# Altium PCB PCB_Gateway.PcbDoc (part 1 of 2)
Units mm, origin at the board's own origin, x right, y up, seen from the top; angles counter-clockwise.
Board outline 107.98 x 107.96 mm, 2 copper layers (Top Layer, Bottom Layer); 168 components, 117 nets, 706 pads, 81 vias.
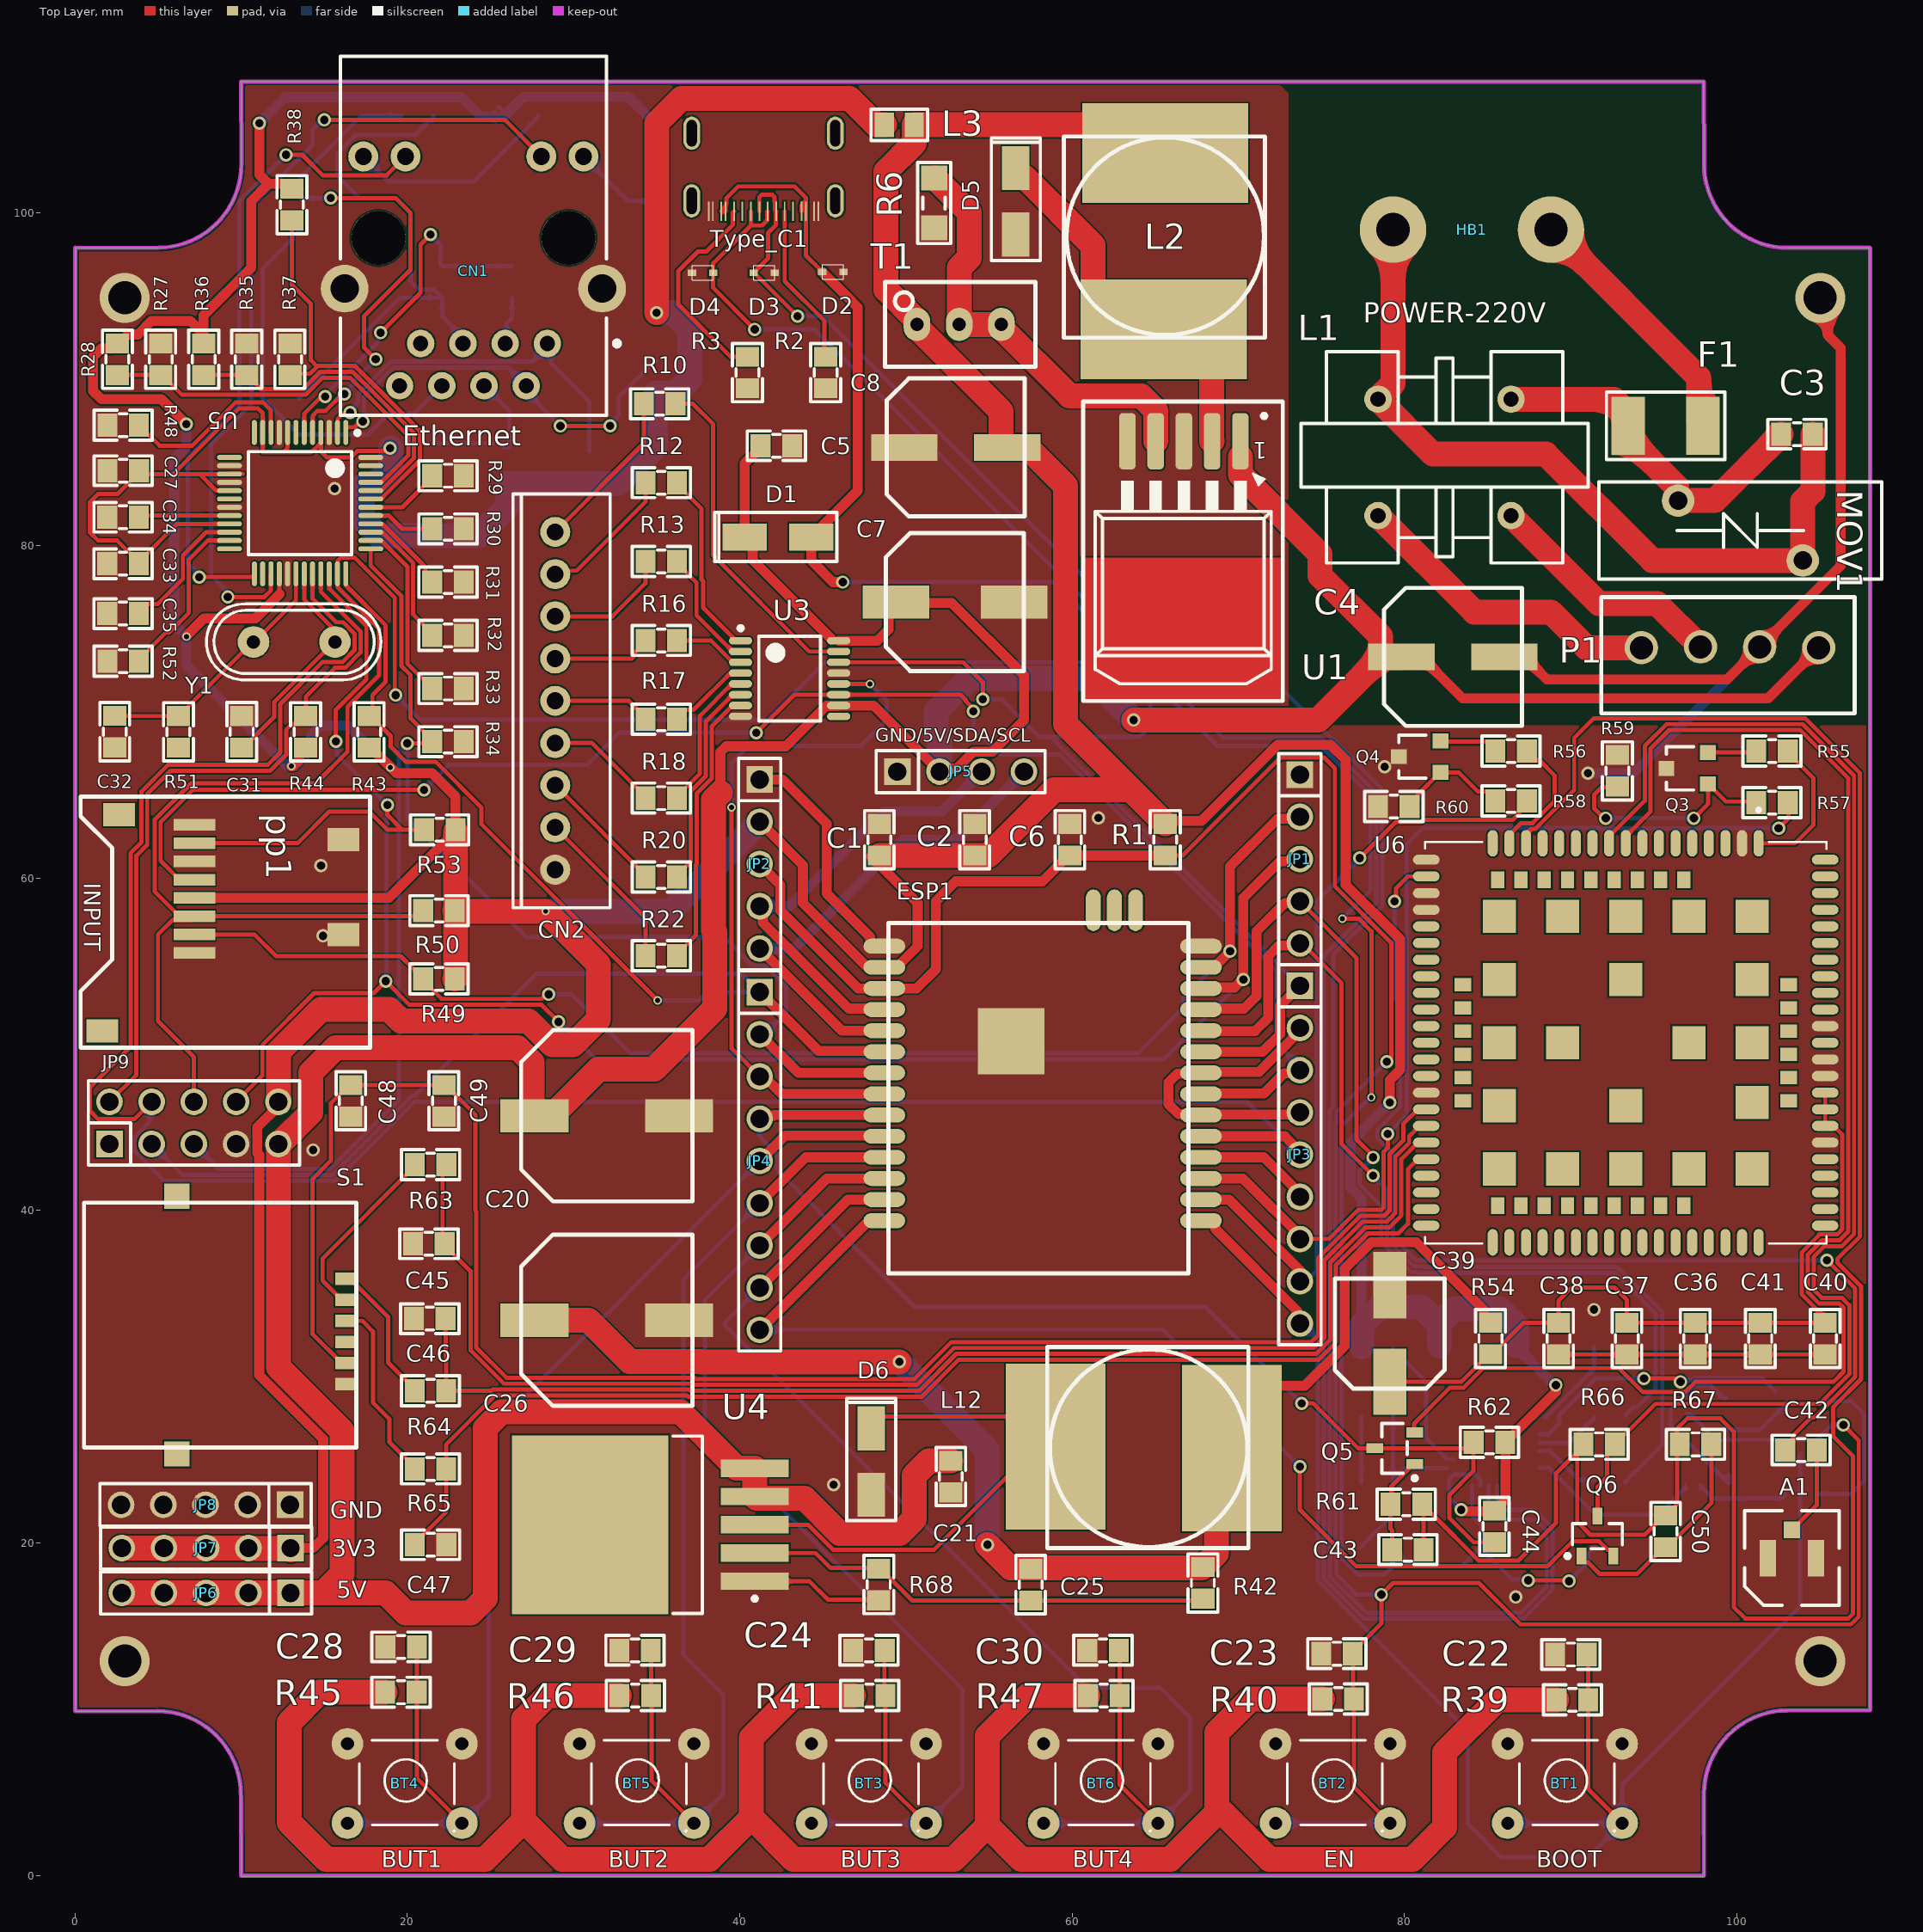
[diagram p0: Top Layer view]
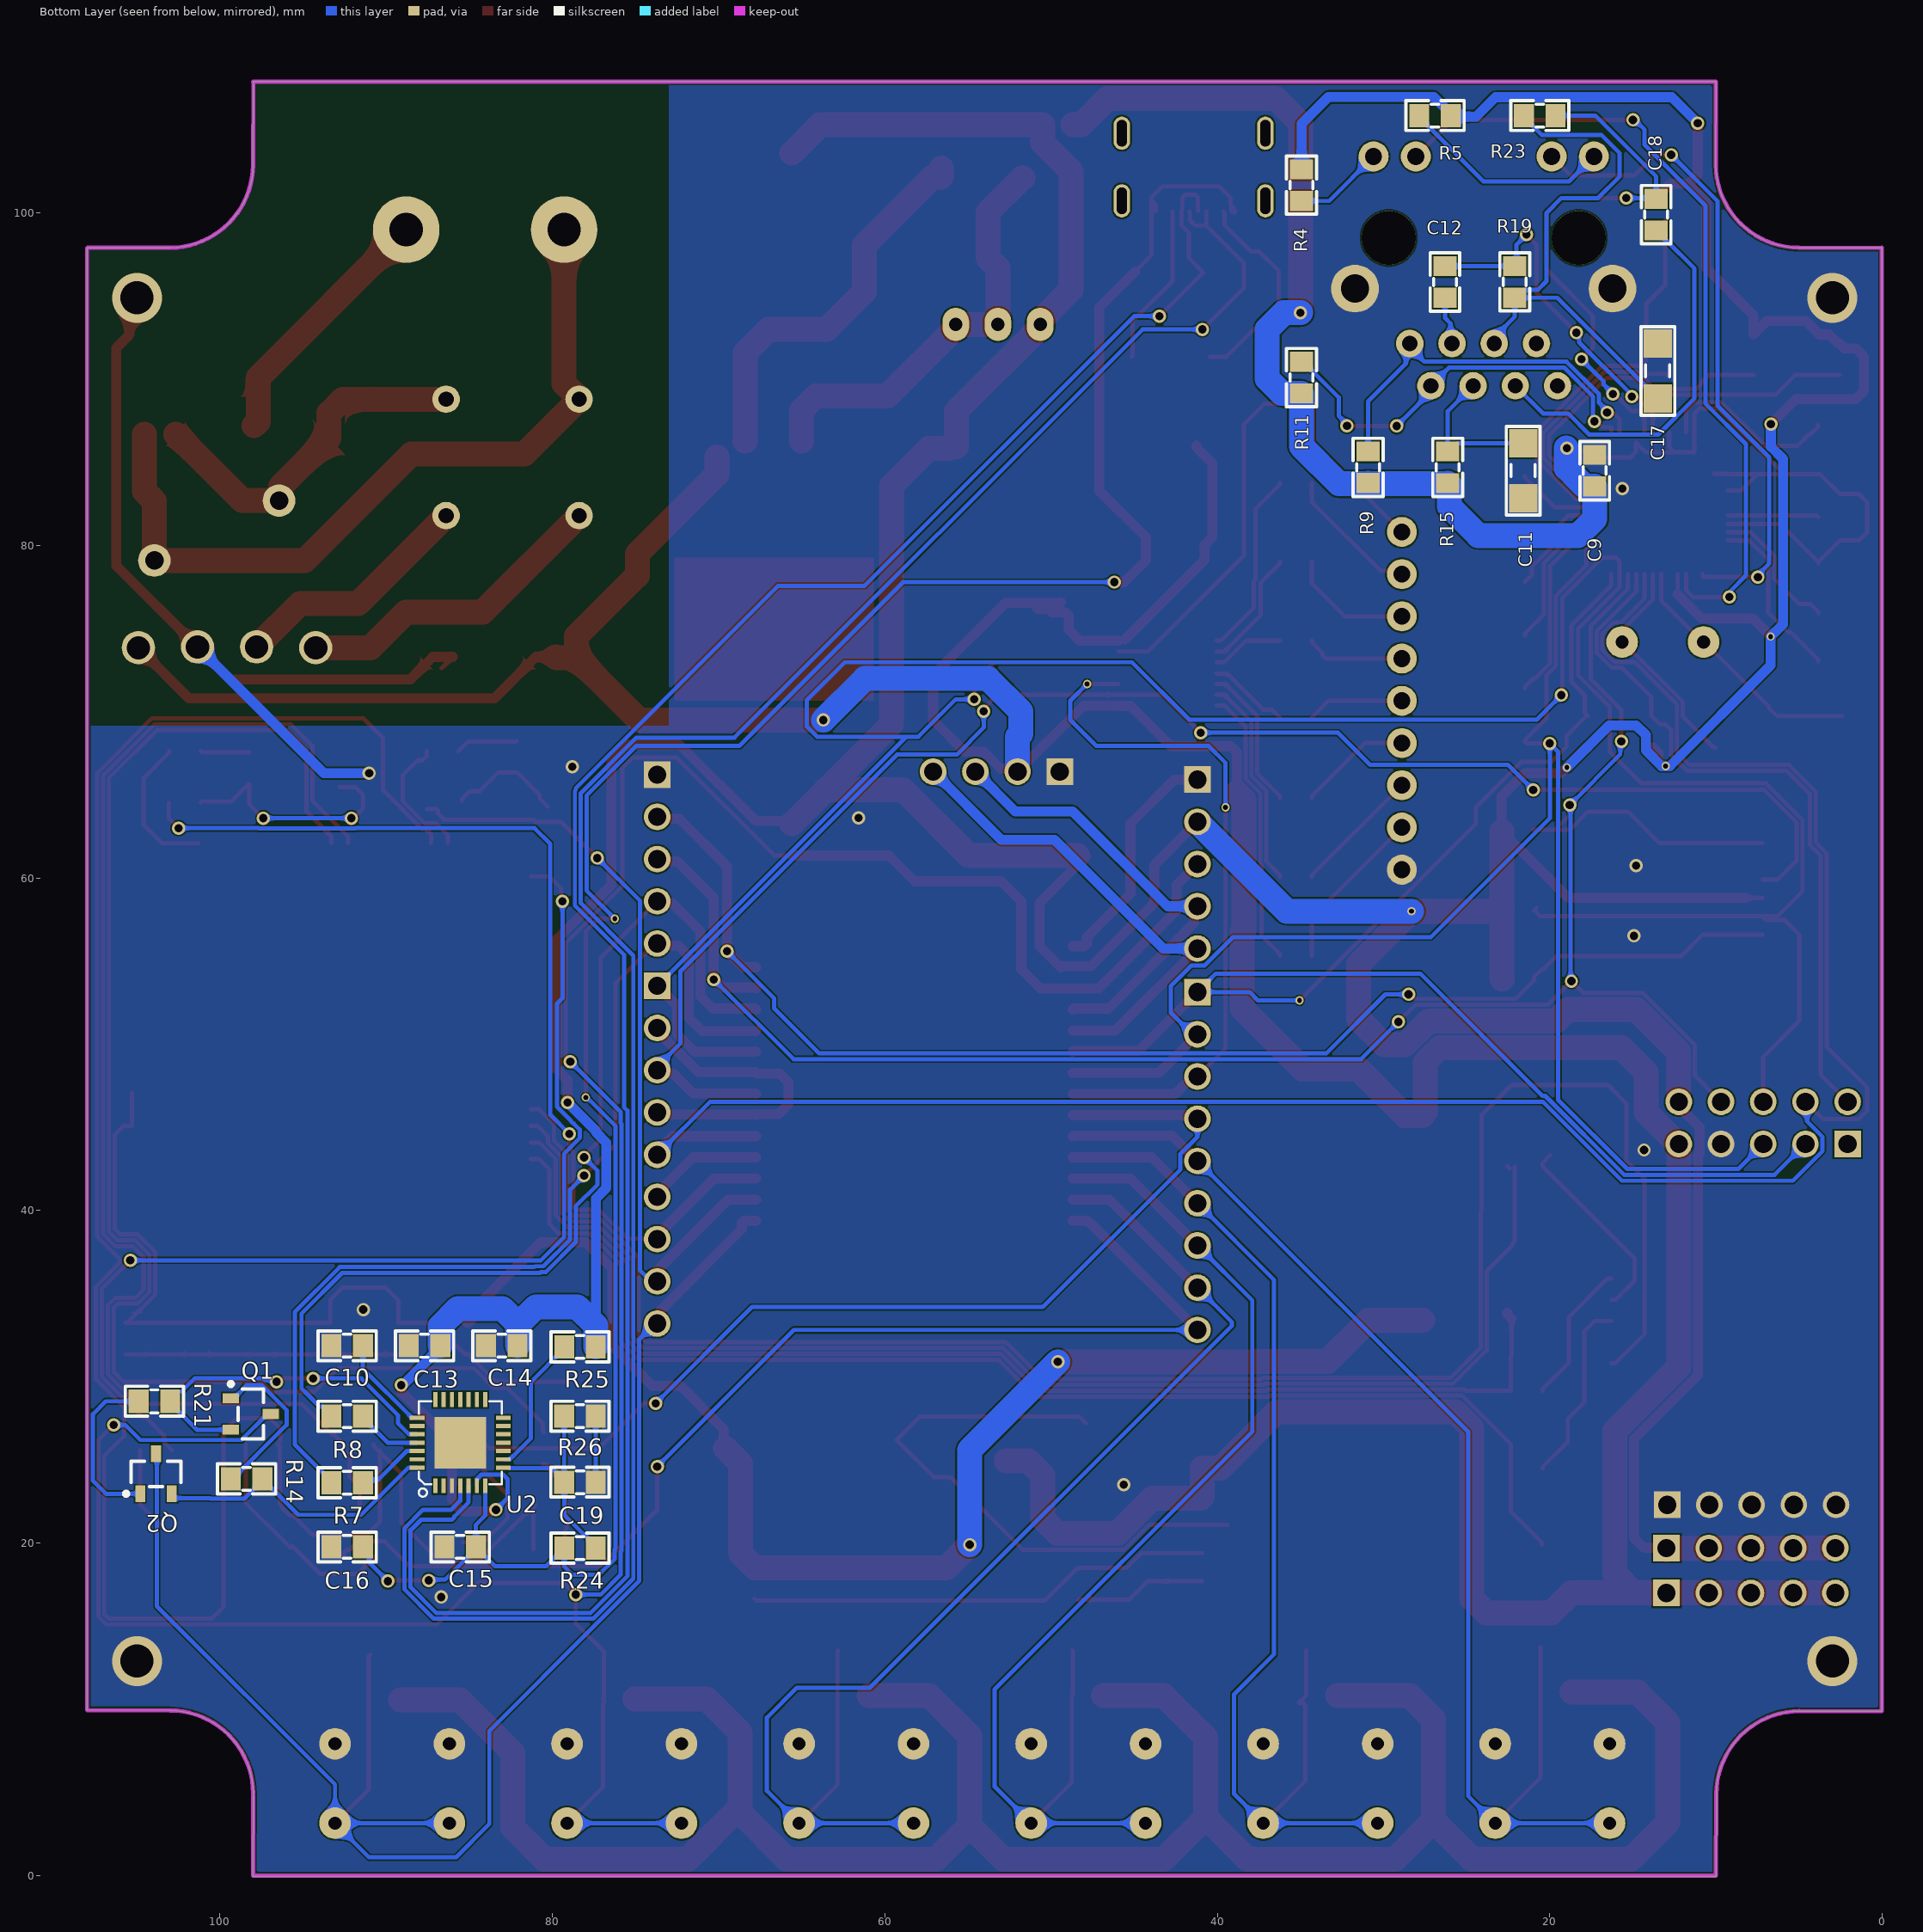
[diagram p1: Bottom Layer view, seen from below]
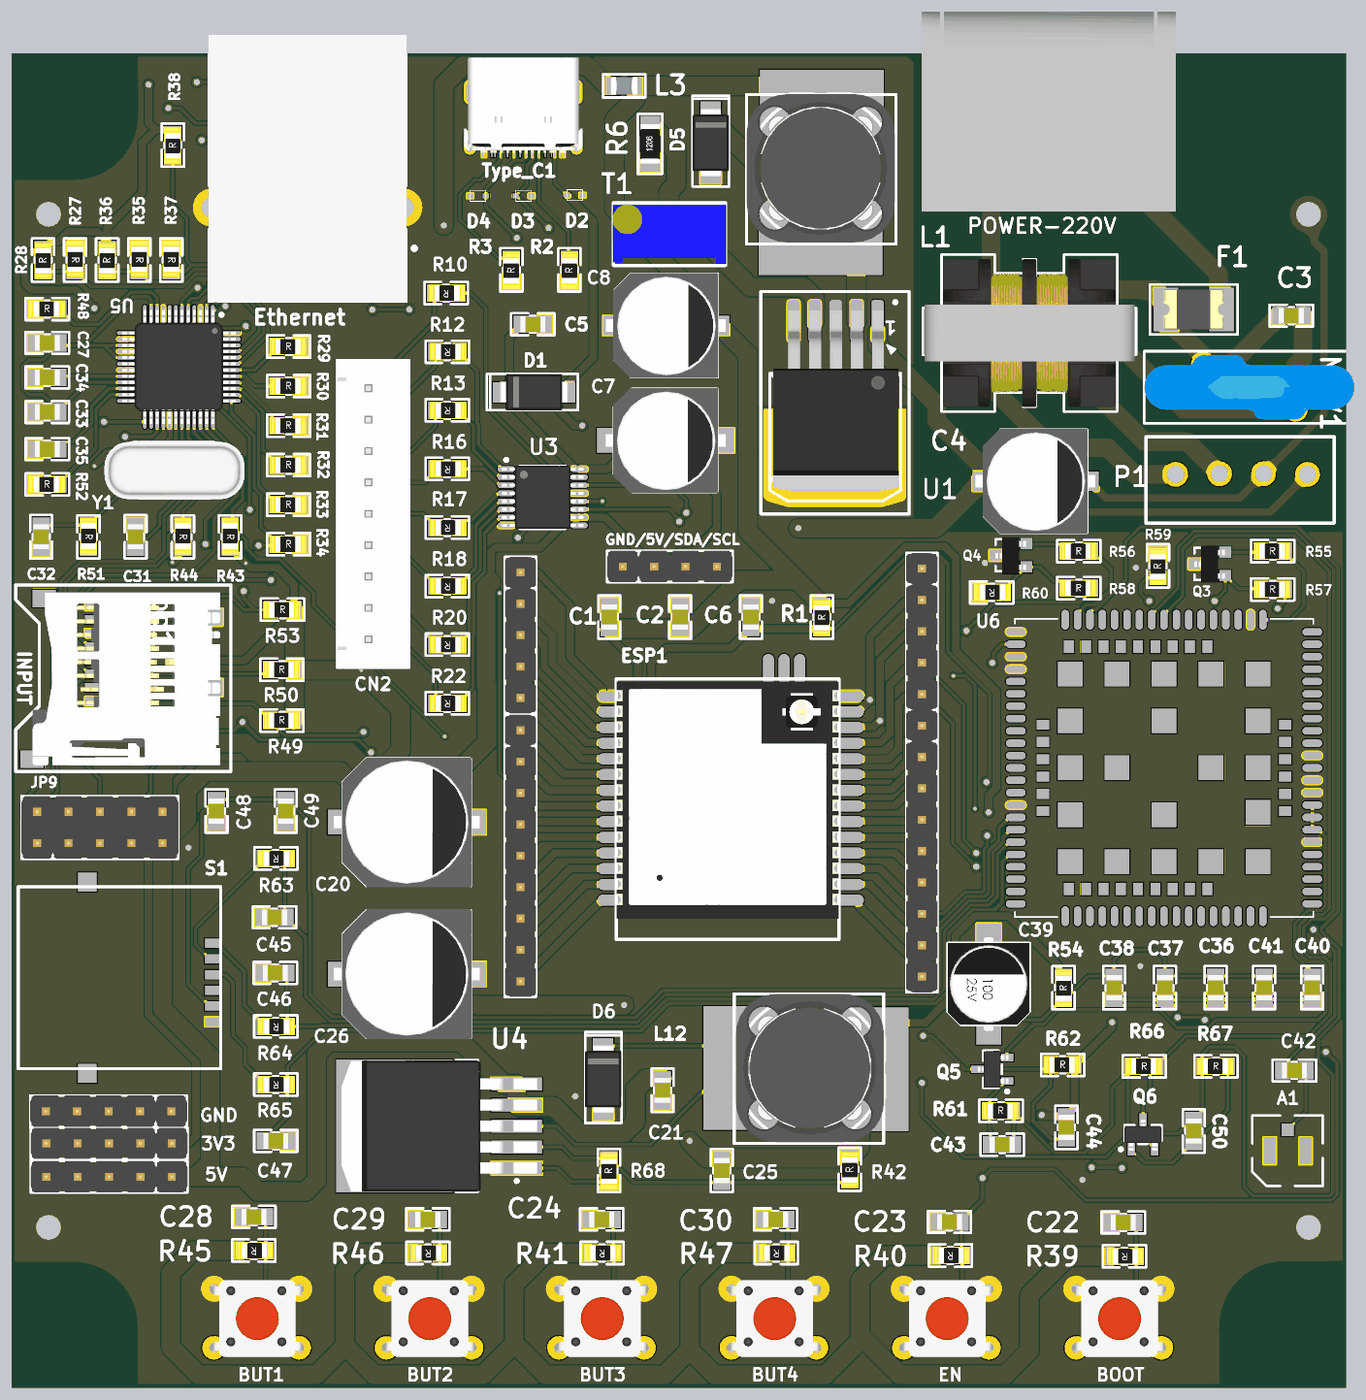
[diagram p3: 3D render of the assembled board from above, using the file's embedded part models]
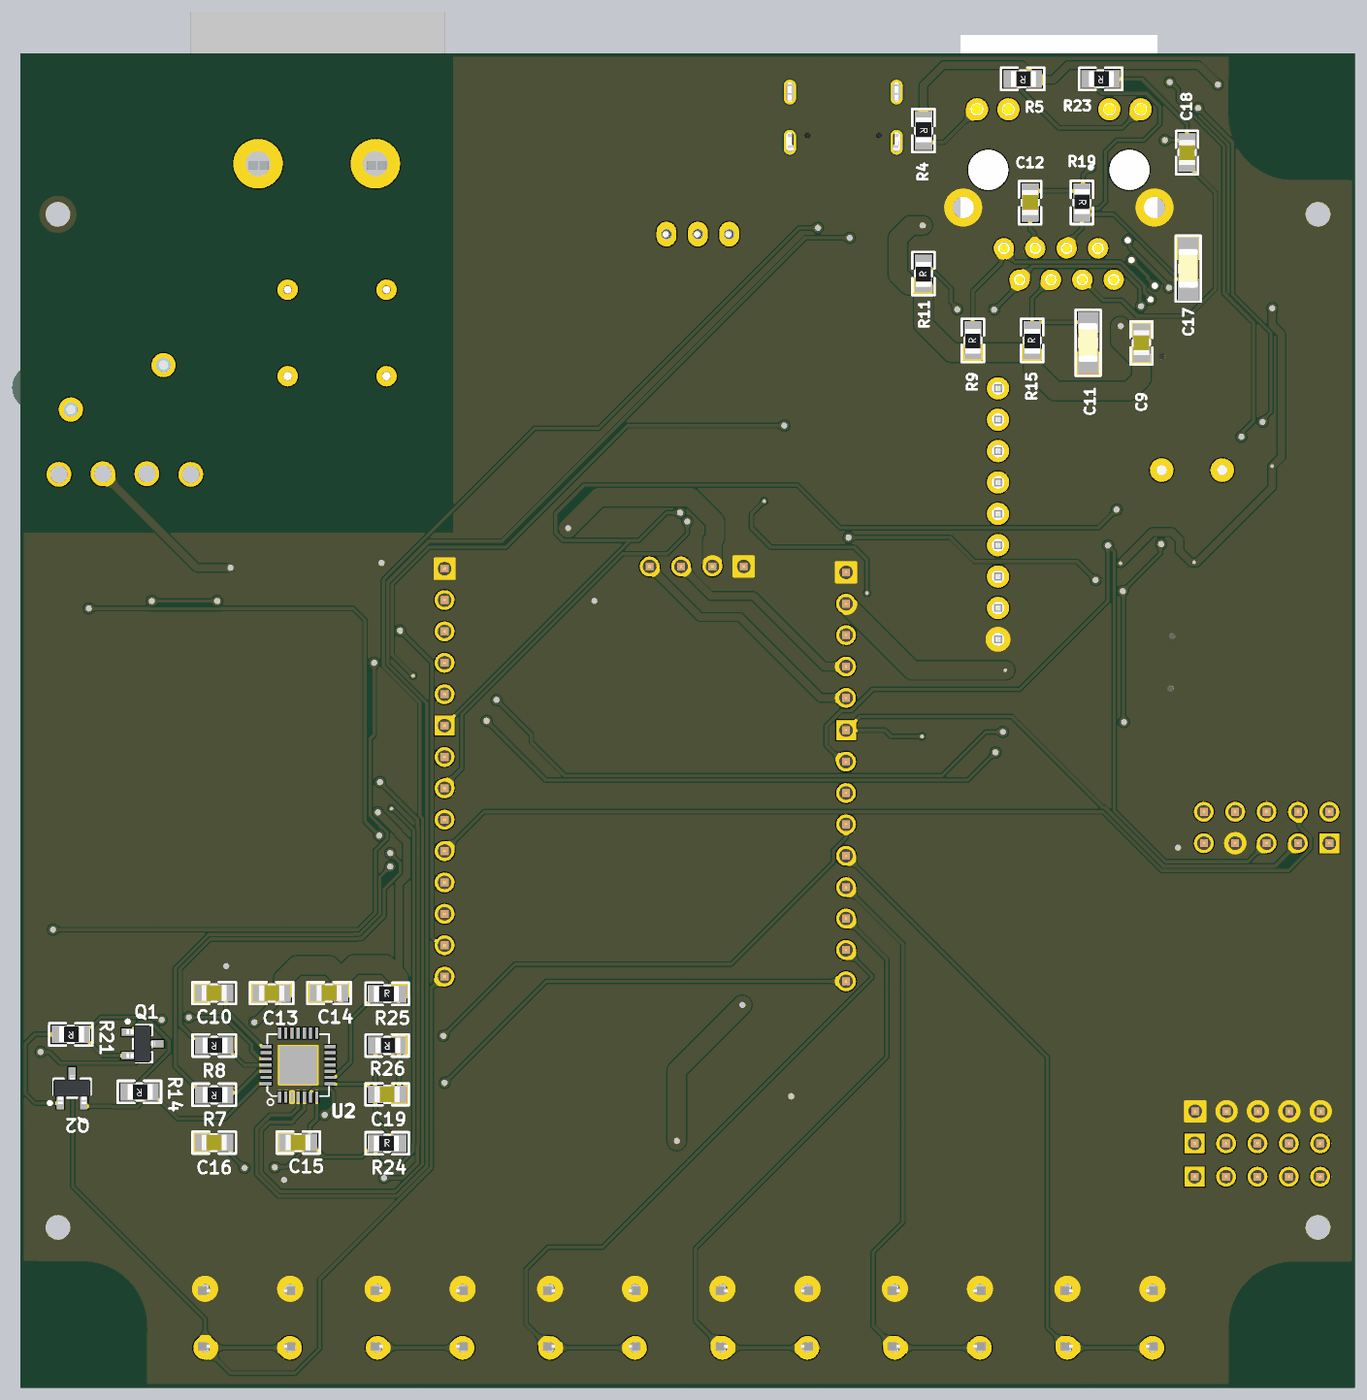
[diagram p4: 3D render of the assembled board from below, using the file's embedded part models]

## Layer stack, top to bottom
Top Solder: solder mask 0.0102, Solder Resist, Dk 3.5
Top Layer: signal copper 0.0356
Dielectric 1: dielectric 0.32, FR-4, Dk 4.8
Bottom Layer: signal copper 0.0356
Bottom Solder: solder mask 0.0102, Solder Resist, Dk 3.5

## Board outline
4.995,9.893 cw(c4.962,4.869) 9.986,4.906 10.007,-0.041 10.007,-0.056 98.016,-0.056 98.007,4.94 cw(c103.031,4.907) 102.994,9.93 108,9.951 108,97.9 107.968,97.916 103.005,97.907 cw(c103.038,102.931) 98.014,102.894 97.993,107.841 98,107.9 10,107.9 10.008,107.868 10.017,102.905 cw(c4.994,102.938) 5.031,97.914 0.084,97.893 0.025,97.925 0.025,9.884

## Design rules (kind name [scope] priority, off if disabled: settings)
Clearance [All] p1: gap=0.1 ignorepadtopadclearanceinfootprint=FALSE
HoleSize [All] p1: absolutevalues=TRUE maxlimit=3.5 minlimit=0.025 maxpercent=80.000 minpercent=20.000
PlaneConnect [All] p1: planeconnectstyle=Direct reliefexpansion=0.508 reliefentries=4 reliefconductorwidth=0.254 reliefairgap=0.254
PolygonConnect [All] p1: connectstyle=Direct reliefconductorwidth=0.254 reliefentries=4 polygonreliefangle="90 Angle" airgapwidth=0.254
RoutingVias [All] p1: holewidth=0.711 width=1.27 viastyle="Through Hole" minholewidth=0.711 minwidth=1.27 maxholewidth=0.711 maxwidth=1.27
SilkToSolderMaskClearance [IsPad] p1: minsilkscreentomaskgap=0.01 clearancetoexposedcopper=TRUE
SolderMaskExpansion [All] p1: expansion=0.102 istentingtop=FALSE useseparateexpansions=TRUE expansionbottom=0.102 istentingbottom=FALSE
Width [All] p1: maxlimit=1.5 minlimit=0.254 preferedwidth=0.6
27 further rules are at their usual default settings.

## Components (designator, comment, footprint, x,y, rotation, side; value= is the part's Value field where it differs from the comment)
A1 "Anten_IPEX" Anten_IPEX 103.3,17.4 r90 top
BT1 "BOOT" "Nut Nhan 4 Chan Cam 6x6" 86.53,8.131 r0 top
BT2 "EN" "Nut Nhan 4 Chan Cam 6x6" 72.57,8.131 r0 top
BT3 "BUT3" "Nut Nhan 4 Chan Cam 6x6" 44.65,8.131 r0 top
BT4 "BUT1" "Nut Nhan 4 Chan Cam 6x6" 16.73,8.131 r0 top
BT5 "BUT2" "Nut Nhan 4 Chan Cam 6x6" 30.69,8.131 r0 top
BT6 "BUT4" "Nut Nhan 4 Chan Cam 6x6" 58.61,8.131 r0 top
C1 "106 (10V/20%)" "tu 0805" 48.4,62.3 r90 top
C2 "104 (10V/10%)" "tu 0805" 54.13,62.3 r90 top
C3 "104 0.1uF/275V" "tu 0805" 103.6,86.7 r0 top
C4 "220uF" "tu nhom 8 (e)" 82.9,73.3 r0 top
C5 "106" "tu 0805" 42.2,86 r0 top
C6 "105 (10V/10%)" "tu 0805" 59.86,62.3 r90 top
C7 "100uF" "tu nhom 8 (f)" 52.95,76.6 r0 top
C8 "220uF" "tu nhom 8 (e)" 53,85.9 r0 top
C9 "104 (10V/10%)" "tu 0805" 17.3,84.5 r90 bottom
C10 "104 (10V/10%)" "tu 0805" 92.349,31.864 r0 bottom
C11 "22nF" "tu 1206" 21.6,84.5 r90 bottom
C12 "6.8nF" "tu 0805" 26.303,95.846 r90 bottom
C13 "104 (10V/10%)" "tu 0805" 87.695,31.861 r0 bottom
C14 "104 (10V/10%)" "tu 0805" 83.049,31.864 r0 bottom
C15 "106 (10V/20%)" "tu 0805" 85.549,19.764 r0 bottom
C16 "104 (10V/10%)" "tu 0805" 92.349,19.764 r0 bottom
C17 "103/10V(10%)" "tu 1206" 13.5,90.5 r90 bottom
C18 "6.8nF" "tu 0805" 13.6,99.9 r90 bottom
C19 "106 (10V/20%)" "tu 0805" 78.349,23.664 r180 bottom
C20 "470uF" "tu nhom 10 (G)" 32,45.7 r0 top
C21 "104 100nF" "tu 0805" 52.7,24 r270 top
C22 "105 (10V/10%)" "tu 0805" 90,13.3 r0 top
C23 "105 (10V/10%)" "tu 0805" 75.924,13.35 r0 top
C24 "105 (10V/10%)" "tu 0805" 47.773,13.55 r0 top
C25 "33nF" "tu 0805" 57.5,17.5 r270 top
C26 "470uF" "tu nhom 10 (G)" 32,33.4 r0 top
C27 "104 (10V/10%)" "tu 0805" 2.903,84.5 r0 top
C28 "105 (10V/10%)" "tu 0805" 19.622,13.75 r0 top
C29 "105 (10V/10%)" "tu 0805" 33.698,13.55 r0 top
C30 "105 (10V/10%)" "tu 0805" 61.849,13.55 r0 top
C31 "22pF" "tu 0805" 10.042,68.8 r270 top
C32 "22pF" "tu 0805" 2.4,68.8 r90 top
C33 "104 (10V/10%)" "tu 0805" 2.9,78.9 r180 top
C34 "475 4.7uF" "tu 0805" 2.9,81.7 r180 top
C35 "103/10V (10%)" "tu 0805" 2.9,75.9 r180 top
C36 "104" "tu 0805" 97.48,32.3 r270 top
C37 "105" "tu 0805" 93.37,32.3 r270 top
C38 "100uF" "tu 0805" 89.261,32.3 r270 top
C39 "100uF" "tu nhom 6.3 (d)" 79.1,32.6 r90 top
C40 "10pF" "tu 0805" 105.3,32.3 r270 top
C41 "33nF" "tu 0805" 101.4,32.3 r270 top
C42 "104 100nF" "tu 0805" 103.854,25.597 r180 top
C43 "102 1nF" "tu 0805" 80.2,19.6 r180 top
C44 "471" "tu 0805" 85.4,21 r270 top
C45 "22pF" "tu 0805" 21.3,38 r180 top
C46 "22pF" "tu 0805" 21.354,33.497 r180 top
C47 "22pF" "tu 0805" 21.4,19.9 r0 top
C48 "104" "tu 0805" 16.6,46.6 r270 top
C49 "33pF" "tu 0805" 22.2,46.6 r270 top
C50 "102 1nF" "tu 0805" 95.7,20.7 r90 top
CN1 "Ethernet" RJ45-HR911105A-TH 23.975,98.5 r0 top
CN2 "XH1X9-P2.54-TH" XH1X9M-P2.54-TH 28.9,70.66 r270 top
D1 "1N5819(SS14)-SM" SMA-J_DO-214AC 42.3,80.5 r180 top
D2 "LESD5D5.0CT1G" LESD5D5.0CT1G, 44.965,96.9 r270 top
D3 "LESD5D5.0CT1G" LESD5D5.0CT1G, 40.83,96.845 r270 top
D4 "LESD5D5.0CT1G" LESD5D5.0CT1G, 38.4,95.955 r90 top
D5 "1N5822(SS34)-SM" SMA-J_DO-214AC 56.6,100.7 r90 top
D6 "1N5824(SS54)-SM" SMA-J_DO-214AC 47.9,24.9 r90 top
ESP1 "ESP32-C5-WROOM-1/1U" ESP32-C5-WROOM-1/1U 48.954,36.215 r0 top
F1 "FUSE-CHIP-SM" FUSE-CHIP-1812-SM 95.7,87.2 r180 top
HB1 "POWER-220V" HB9500 88.8,99 r180 top
JP1 "JP esp" "JP 1x5 DT" 73.7,66.22 r270 top
JP2 "JP esp" "JP 1x5 DT" 41.2,65.92 r270 top
JP3 "JP esp" "JP 1x9 DT" 73.7,53.52 r270 top
JP4 "JP esp" "JP 1x9 DT" 41.2,53.14 r270 top
JP5 "GND/5V/SDA/SCL" "JP 1x4 DT" 49.48,66.4 r0 top
JP6 "5V" "JP 1x5 DT" 12.98,17 r180 top
JP7 "3V3" "JP 1x5 DT" 12.98,19.7 r180 top
JP8 "GND" "JP 1x5 DT" 12.94,22.3 r180 top
JP9 "JP 2x5 2.54" "JP 2x5 DT" 7.16,45.27 r0 top
L1 "10uH" L-UU9.8-L17.0-W12.0-H17.0-TH 82.4,85.3 r0 top
L2 "33uH - 3A SMD" "Cuon Cam 12x12x10" 71.6,104.6 r180 top
L3 "10uH" L-CHIP-0805-T1.05-SM 49.6,105.3 r180 top
L12 "33uH - 3A SMD" "Cuon Cam 12x12x10" 70.6,19.7 r90 top
MOV1 "10D561-560V" MOV-P7.5-D17.0-T3.6-TH 100.2,80.9 r0 top
P1 "15EDG - 4P - dt" "15EDG - 4P - dt" 107.071,76.9 r180 top
pp1 "Micro SD card TF5" "MicroSD TF V5" 7.254,60 r270 top
Q1 "S8050(J3Y)-SM" SOT23-3_TO-236AB 98.149,27.764 r180 bottom
Q2 "S8050(J3Y)-SM" SOT23-3_TO-236AB 103.849,24.164 r90 bottom
Q3 "C1815" SOT23 97,66.6 r90 top value=C9014
Q4 "C1815" SOT23 80.9,67.3 r90 top value=C9014
Q5 "MMBT3904" SOT23-3_TO-236AB 79.4,25.7 r180 top
Q6 "MMBT3904" SOT23-3_TO-236AB 91.6,20.417 r90 top
R1 "10k" "tro smd 0805" 65.539,62.303 r90 top
R2 "5.1k" "tro smd 0805" 45.1,90.4 r90 top
R3 "5.1k" "tro smd 0805" 40.4,90.4 r90 top
R4 "1k" "tro smd 0805" 34.871,101.678 r270 bottom
R5 "1k" "tro smd 0805" 26.9,105.8 r0 bottom
R6 "1.21k" "tro smd 1206" 51.7,100.6 r90 top
R7 "4.7k" "tro smd 0805" 92.347,23.564 r0 bottom
R8 "4.7k" "tro smd 0805" 92.347,27.564 r0 bottom
R9 "51R" "tro smd 0805" 31,84.7 r90 bottom
R10 "330R" "Tro SMD 0805" 35.184,88.46 r180 top
R11 "51R" "tro smd 0805" 35,90.1 r90 bottom
R12 "330R" "Tro SMD 0805" 35.284,83.717 r180 top
R13 "330R" "Tro SMD 0805" 35.284,78.974 r180 top
R14 "10k" "tro smd 0805" 98.4,23.8 r0 bottom
R15 "10R" "tro smd 0805" 26.2,84.7 r90 bottom
R16 "330R" "Tro SMD 0805" 35.284,74.231 r180 top
R17 "330R" "Tro SMD 0805" 35.284,69.488 r180 top
R18 "330R" "Tro SMD 0805" 35.284,64.746 r180 top
R19 "82R" "tro smd 0805" 22.044,95.86 r270 bottom
R20 "330R" "Tro SMD 0805" 35.284,60.003 r180 top
R21 "10k" "tro smd 0805" 103.949,28.464 r0 bottom
R22 "330R" "Tro SMD 0805" 35.284,55.26 r180 top
R23 "82R" "tro smd 0805" 20.6,105.8 r0 bottom
R24 "22k" "tro smd 0805" 78.347,19.764 r180 bottom
R25 "1k" "tro smd 0805" 78.347,31.864 r180 bottom
R26 "22k" "tro smd 0805" 78.347,27.564 r0 bottom
R27 "10k" "tro smd 0805" 5.22,91.2 r270 top
R28 "10k" "tro smd 0805" 2.5,91.2 r90 top
R29 "10k" "tro smd 0805" 22.446,84.261 r0 top
R30 "10k" "tro smd 0805" 22.446,81.061 r0 top
R31 "10k" "tro smd 0805" 22.446,77.861 r0 top
R32 "10k" "tro smd 0805" 22.446,74.661 r0 top
R33 "10k" "tro smd 0805" 22.446,71.461 r0 top
R34 "10k" "tro smd 0805" 22.446,68.261 r0 top
R35 "10k" "tro smd 0805" 10.407,91.2 r270 top
R36 "10k" "tro smd 0805" 7.686,91.2 r90 top
R37 "10k" "tro smd 0805" 13,91.2 r270 top
R38 "10k" "tro smd 0805" 13,100.5 r90 top
R39 "10k" "tro smd 0805" 90.1,10.5 r180 top
R40 "10k" "tro smd 0805" 76.004,10.562 r180 top
R41 "10k" "tro smd 0805" 47.813,10.762 r180 top
R42 "7.5k" "tro smd 0805" 67.8,17.6 r90 top
R43 "10k" "tro smd 0805" 17.761,68.797 r270 top
R44 "10k" "tro smd 0805" 13.94,68.797 r270 top
R45 "10k" "tro smd 0805" 19.622,10.962 r180 top
R46 "10k" "tro smd 0805" 33.718,10.762 r180 top
R47 "10k" "tro smd 0805" 61.909,10.762 r180 top
R48 "12k" "tro smd 0805" 2.9,87.3 r0 top
R49 "10k" "tro smd 0805" 21.9,54 r0 top
R50 "10k" "tro smd 0805" 21.9,58.1 r0 top
R51 "1M" "tro smd 0805" 6.297,68.797 r270 top
R52 "10k" "tro smd 0805" 2.9,73.1 r0 top
R53 "10k" "tro smd 0805" 21.946,62.961 r0 top
R54 "30R - Ferrite Beads" "Tro SMD 0805" 85.1,32.3 r90 top
R55 "1k" "tro smd 0805" 102.1,67.7 r0 top
R56 "1k" "tro smd 0805" 86.4,67.7 r0 top
R57 "4.7k" "tro smd 0805" 102.1,64.6 r0 top
R58 "4.7k" "tro smd 0805" 86.4,64.7 r0 top
R59 "47k" "tro smd 0805" 92.739,66.446 r90 top
R60 "47k" "tro smd 0805" 79.354,64.239 r180 top
R61 "4.7k" "tro smd 0805" 80.1,22.4 r0 top
R62 "4.7k" "tro smd 0805" 85.1,26.117 r0 top
R63 "22R" "tro smd 0805" 21.4,42.7 r180 top
R64 "22R" "tro smd 0805" 21.397,29.1 r180 top
R65 "22R" "tro smd 0805" 21.397,24.4 r180 top
R66 "4.7k" "tro smd 0805" 91.7,26 r0 top
R67 "4.7k" "tro smd 0805" 97.5,26 r0 top
R68 "2k" "tro smd 0805" 48.3,17.5 r90 top
S1 "SIM SOCKET 6P" "SIM SOCKET 6P" 16.935,25.74 r90 top
T1 "10K" "Bien Tro Vi Chinh Dung" 53.2,93.3 r0 top
Type_C1 "Type_C_16P" Type_C_16P 41.43,100.1 r180 top
U1 "LM2976" TO263 67.1,80.3 r180 top
U2 "cp2102" cp2102 85.549,26.038 r90 bottom
U3 "74HC595-SM" TSSOP16-0.65-4.4MM 43,72 r0 top
U4 "XL4005-SM" D2PAK-6_TO-263BA 34.2,21.1 r180 top
U5 "W5500-SM" LQFP48-0.5-7X7MM 13.55,82.55 r270 top
U6 "A7677_openCPU" A7677 93.3,50.089 r270 top
Y1 "25Mhz" "Thach Anh 2 chan cam" 13.2,74.2 r0 top value=4Mhz

## Footprints (in the part's own frame and the unit in brackets; to place one, negate y for a bottom-side part, rotate by r counter-clockwise, add the part's x,y. Pads: shape width x height; smd on the part's side, far side on the other; paste and mask are expansions set on the pad)
"15EDG - 4P - dt" [mm]
  round 2 hole 1.4: 1(2.159,3.048) 2(5.715,3) 3(9.271,3) 4(12.827,3.048)
  silkscreen extent 0,0 15.24,7
A7677 [mm]
  oval 1.6x0.6 smd: 1(-12,8) 2(-12,7) 3(-12,6) 4(-12,5) 5(-12,4) 6(-12,3) 7(-12,2) 8(-12,1) 9(-12,0) 10(-12,-1) 11(-12,-2) 12(-12,-3) 13(-12,-4) 14(-12,-5) 15(-12,-6) 16(-12,-7) 17(-12,-8) 35(12,-8) 36(12,-7) 37(12,-6) 38(12,-5) 39(12,-4) 40(12,-3) 41(12,-2) 42(12,-1) 43(12,0) 44(12,1) 45(12,2) 46(12,3) 47(12,4) 48(12,5) 49(12,6) 50(12,7) 51(12,8)
  oval 0.6x1.6 smd: 18(-8,-12) 19(-7,-12) 20(-6,-12) 21(-5,-12) 22(-4,-12) 23(-3,-12) 24(-2,-12) 25(-1,-12) 26(0,-12) 27(1,-12) 28(2,-12) 29(3,-12) 30(4,-12) 31(5,-12) 32(6,-12) 33(7,-12) 34(8,-12) 52(8,12) 53(7,12) 54(6,12) 55(5,12) 56(4,12) 57(3,12) 58(2,12) 59(1,12) 60(0,12) 61(-1,12) 62(-2,12) 63(-3,12) 64(-4,12) 65(-5,12) 66(-6,12) 67(-7,12) 68(-8,12) 89(-11.01,-12) 90(-10.01,-12) 91(-9,-12) 92(9,-12) 93(10,-12) 94(11,-12) 95(11,12) 96(10,12) 97(9,12) 98(-9.01,12) 99(-10.01,12) 100(-11.01,12)
  rect 2x2 smd: 69(-7.611,7.6) 70(-7.611,3.8) 71(-7.611,0) 72(-7.611,-3.8) 73(-7.611,-7.6) 74(-3.811,-7.6) 75(-0.011,-7.6) 76(3.789,-7.6) 77(7.589,-7.6) 78(7.589,-3.8) 79(7.589,0) 80(7.589,3.8) 81(7.589,7.6) 82(3.589,7.6) 83(-0.011,7.6) 84(-3.811,7.6) 85(-3.811,0) 86(-0.011,-3.8) 87(3.789,0) 88(-0.011,3.8)
  rect 1x0.8 smd: 101(-9.81,3.5) 102(-9.81,2.1) 103(-9.81,0.7) 104(-9.81,-0.7) 105(-9.81,-2.1) 106(-9.81,-3.5) 113(9.79,-3.5) 114(9.79,-2.1) 115(9.79,-0.7) 116(9.79,0.7) 117(9.79,2.1) 118(9.79,3.5) 125(-9.81,-4.9) 126(-9.81,-6.3) 127(-9.81,-7.7) 128(9.79,-7.7) 129(9.79,-6.3) 130(9.79,-4.9)
  rect 0.8x1 smd: 107(-3.5,-9.8) 108(-2.1,-9.8) 109(-0.7,-9.8) 110(0.7,-9.8) 111(2.1,-9.8) 112(3.5,-9.8) 119(3.5,9.8) 120(2.1,9.8) 121(0.7,9.8) 122(-0.7,9.8) 123(-2.1,9.8) 124(-3.5,9.8)
  silkscreen extent -14.1,-12.07 12.08,12.08, body extent -12.04,-11.94 12.01,12.09, height 1.2
Anten_IPEX [mm]
  rect 1x1 smd: 2(3.4,0)
  rect 2.2x1 smd: 3(1.7,-1.45) 4(1.7,1.45)
  silkscreen extent -1.15,-2.85 4.55,2.85
"Bien Tro Vi Chinh Dung" [mm] "Bien tro vi chinh"
  oval 1.6x2 hole 0.8: 1(-2.54,0) 2(0,0) 3(2.54,0)
  silkscreen extent -4.47,-2.54 4.6,2.54, body extent -4.54,-2.4 4.66,2.4, height 12.02
cp2102 [mm]
  rect 0.9x0.254 smd: 1(-2.59,1.5) 2(-2.59,1) 3(-2.59,0.5) 4(-2.59,0) 5(-2.59,-0.5) 6(-2.59,-1) 7(-2.59,-1.5) 15(2.59,-1.5) 16(2.59,-1) 17(2.59,-0.5) 18(2.59,0) 19(2.59,0.5) 20(2.59,1) 21(2.59,1.5)
  rect 0.254x0.9 smd: 8(-1.5,-2.59) 9(-1,-2.59) 10(-0.5,-2.59) 11(0,-2.59) 12(0.5,-2.59) 13(1,-2.59) 14(1.5,-2.59) 22(1.5,2.59) 23(1,2.59) 24(0.5,2.59) 25(0,2.59) 26(-0.5,2.59) 27(-1,2.59) 28(-1.5,2.59)
  rect 3.1x3.1 smd: 29(0,0)
  silkscreen extent -3.25,-2.5 2.5,2.5, body extent -2.51,-2.51 2.5,2.5, height 0.5
"Cuon Cam 12x12x10" [mm] "Cuon Cam 12x12x10"
  rect 10x6 smd: 1(6.1,11.6) 2(6,1)
  silkscreen extent 0,0 12.1,12.1, body extent 0.1,-0.2 12.1,12.14, height 7.51
D2PAK-6_TO-263BA [mm]
  rect 4.1x1.05 smd: 1(-6.7,3.4) 2(-6.7,1.7) 3(-6.7,0) 4(-6.7,-1.7) 5(-6.7,-3.4)
  rect 9.4x10.75 smd: 6(3.2,0)
  silkscreen extent -6.83,-5.33 -1.78,5.33, body extent -8.35,-5.32 7.5,5.32, height 4.8
ESP32-C5-WROOM-1/1U [mm] "QFP, 62-Leads, Body 15.40x19.35mm, Pitch 0.65mm, IPC Medium Density"
  oval 2.5x0.9 smd: 1(-0.254,19.685) 2(-0.254,18.415) 3(-0.254,17.145) 4(-0.254,15.875) 5(-0.254,14.605) 6(-0.254,13.335) 7(-0.254,12.065) 8(-0.254,10.795) 9(-0.254,9.525) 10(-0.254,8.255) 11(-0.254,6.985) 12(-0.254,5.715) 13(-0.254,4.445) 14(-0.254,3.175) 15(18.796,3.175) 16(18.796,4.445) 17(18.796,5.715) 18(18.796,6.985) 19(18.796,8.255) 20(18.796,9.525) 21(18.796,10.795) 22(18.796,12.065) 23(18.796,13.335) 24(18.796,14.605) 25(18.796,15.875) 26(18.796,17.145) 27(18.796,18.415) 28(18.796,19.685)
  rect 4x4 smd: 29(7.366,13.97)
  oval 0.9x2.5 smd: 30(14.859,21.844) 31(13.589,21.844) 32(12.319,21.844)
  silkscreen extent 0,0 18.03,21.08, body extent 0.01,1.68 18.03,20.88, height 3.1
FUSE-CHIP-1812-SM [mm]
  rect 2x3.5 smd: 1(-2.25,0) 2(2.25,0)
  silkscreen extent -3.56,-2.03 3.56,2.03, body extent -2.41,-1.61 2.41,1.61, height 1.32
HB9500 [mm]
  round 4 hole 2: 1(0,0) 2(9.5,0)
  body extent -5.47,-12.32 15.13,3.88, height 25.04
"JP 1x4 DT" [mm] "4 pins, 1 row, straight, gold plating"
  rect 1.6x1.6 hole 1.1: 1(0,0)
  round 1.6 hole 1.1: 2(2.54,0) 3(5.08,0) 4(7.62,0)
  silkscreen extent -1.27,-1.27 8.89,1.27, body extent -1.27,-1.27 8.89,1.27, height 8.54
"JP 1x5 DT" [mm] "5 pins, 1 row, straight, gold plating"
  rect 1.6x1.6 hole 1.1: 1(0,0)
  round 1.6 hole 1.1: 2(2.54,0) 3(5.08,0) 4(7.62,0) 5(10.16,0)
  silkscreen extent -1.27,-1.27 11.43,1.27, body extent -1.27,-1.27 11.43,1.27, height 8.54
"JP 1x9 DT" [mm] "9 pins, 1 row, straight, gold plating"
  rect 1.6x1.6 hole 1.1: 1(0,0)
  round 1.6 hole 1.1: 2(2.54,0) 3(5.08,0) 4(7.62,0) 5(10.16,0) 6(12.7,0) 7(15.24,0) 8(17.78,0) 9(20.32,0)
  silkscreen extent -1.27,-1.27 21.59,1.27, body extent -1.27,-1.27 21.59,1.27, height 8.54
"JP 2x5 DT" [mm] "10 pins, dual pin, straight, gold plating"
  rect 1.6x1.6 hole 1.1: 1(-5.08,-1.27)
  round 1.6 hole 1.1: 2(-2.54,-1.27) 3(0,-1.27) 4(2.54,-1.27) 5(5.08,-1.27) 6(5.08,1.27) 7(2.54,1.27) 8(0,1.27) 9(-2.54,1.27) 10(-5.08,1.27)
  silkscreen extent -6.35,-2.54 6.35,2.54, body extent -6.35,-2.54 6.35,2.54, height 8.55
L-CHIP-0805-T1.05-SM [mm]
  rect 1.15x1.45 smd: 1(-0.9,0) 2(0.9,0)
  silkscreen extent -1.7,-0.94 1.7,0.94, body extent -1.1,-0.72 1.1,0.73, height 1.05
L-UU9.8-L17.0-W12.0-H17.0-TH [mil]
  round 65 hole 36: 1(-157.48,137.8) 2(-157.48,-137.8) 3(157.48,137.8) 4(157.48,-137.8)
  silkscreen extent -340,-250 340,250, body extent -335,-236 335,236, height 669
LESD5D5.0CT1G, [mm]
  rect 0.4x0.5 smd: 1(0.445,1.27) 2(0.445,0)
  silkscreen extent 0,0 0.89,1.27
LQFP48-0.5-7X7MM [mm]
  oval 1.5x0.3 smd: 1(-4.25,2.75) 2(-4.25,2.25) 3(-4.25,1.75) 4(-4.25,1.25) 5(-4.25,0.75) 6(-4.25,0.25) 7(-4.25,-0.25) 8(-4.25,-0.75) 9(-4.25,-1.25) 10(-4.25,-1.75) 11(-4.25,-2.25) 12(-4.25,-2.75) 25(4.25,-2.75) 26(4.25,-2.25) 27(4.25,-1.75) 28(4.25,-1.25) 29(4.25,-0.75) 30(4.25,-0.25) 31(4.25,0.25) 32(4.25,0.75) 33(4.25,1.25) 34(4.25,1.75) 35(4.25,2.25) 36(4.25,2.75)
  oval 0.3x1.5 smd: 13(-2.75,-4.25) 14(-2.25,-4.25) 15(-1.75,-4.25) 16(-1.25,-4.25) 17(-0.75,-4.25) 18(-0.25,-4.25) 19(0.25,-4.25) 20(0.75,-4.25) 21(1.25,-4.25) 22(1.75,-4.25) 23(2.25,-4.25) 24(2.75,-4.25) 37(2.75,4.25) 38(2.25,4.25) 39(1.75,4.25) 40(1.25,4.25) 41(0.75,4.25) 42(0.25,4.25) 43(-0.25,4.25) 44(-0.75,4.25) 45(-1.25,4.25) 46(-1.75,4.25) 47(-2.25,4.25) 48(-2.75,4.25)
  silkscreen extent -4.35,-3.1 3.1,3.58, body extent -4.6,-4.6 4.6,4.6, height 1.6
"MicroSD TF V5" [mm]
  rect 1.4x1.9 smd: 0(-3.8,-4.6) 0(9.2,-5.6) 9(-2.3,8.9) 10(3.4,8.9)
  rect 0.7x2.5 smd: 1(4.5,-0.054) 2(3.4,-0.054) 3(2.3,-0.054) 4(1.2,-0.054) 5(0.1,-0.054) 6(-1,-0.054) 7(-2.1,-0.054) 8(-3.2,-0.054)
  silkscreen extent -4.9,-6.91 10.2,10.5, body extent -4.35,-5.54 9.75,9.66, height 2
MOV-P7.5-D17.0-T3.6-TH [mil]
  round 77 hole 44: 1(-147.64,70.87) 2(147.64,-70.87)
  silkscreen extent -335,-115 335,115, body extent -335,-102 335,102, height 787
"Nut Nhan 4 Chan Cam 6x6" [mil] "SW button 4pin, 250 x250 mil"
  round 75 hole 31: 1(-13,-8) 1(258,-8) 2(-13,-196) 2(258,-196)
  silkscreen extent 15,-215 240,0, body extent -31,-225 281,19, height 276
RJ45-HR911105A-TH [mil]
  round 65 hole 36: 1(175.2,-250) 2(125.2,-350) 3(75.2,-250) 4(25.2,-350) 5(-24.8,-250) 6(-74.8,-350) 7(-124.8,-250) 8(-174.8,-350)
  round 71 hole 40: 9(260.83,192.91) 10(160.83,192.91) 11(-160.83,192.91) 12(-260.83,192.91)
  round 113 hole 67: SHELL1(304.92,-120.08) SHELL2(-304.92,-120.08)
  round 127.95 hole 127.95 unplated: ""(-225,0) ""(225,0)
  silkscreen extent -315,-420 346,430, body extent -315,-420 315,430, height 549
"SIM SOCKET 6P" [mm]
  rect 0.75x1.25 smd: 1(5.08,0.635) 2(3.81,0.635) 3(7.62,0.635) 4(6.35,0.635) 5(10.16,0.635) 6(8.89,0.635)
  rect 1.524x1.524 smd: ""(-0.381,10.795) ""(15.113,10.795)
  silkscreen extent 0,0 14.73,16.38
SMA-J_DO-214AC [mm]
  rect 2.65x1.65 smd: 1(-2,0) 2(2,0)
  silkscreen extent -3.55,-1.49 3.81,1.46, body extent -2.8,-1.49 2.8,1.46, height 2.9
SOT23 [mm] "SOT23"
  rect 0.9x0.95 smd: 1(-0.95,-1.25) 2(0,1.25)
  rect 0.9x0.95 smd mask+0: 3(0.95,-1.25)
  silkscreen extent -1.3,-0.38 1.3,1.25, body extent -1.52,-1.23 1.48,1.27, height 1.06
SOT23-3_TO-236AB [mm]
  rect 1x0.6 smd: 1(-1.2,0.95) 2(-1.2,-0.95) 3(1.2,0)
  silkscreen extent -1.33,-1.5 0.76,1.92, body extent -1.3,-1.5 1.3,1.5, height 1.1
"Thach Anh 2 chan cam" [mm]
  round 1.905 hole 0.8: 1(-2.45,0) 2(2.45,0)
  silkscreen extent -5.28,-2.29 5.21,2.29, body extent -5.68,-2.36 5.67,2.29, height 3.5
TO263 [mm]
  rrect50% 1x3.4 smd: 1(-3.019,-5.969) 2(-1.319,-5.969) 4(2.081,-5.969) 5(3.781,-5.969)
  rrect50% 1x3.4 smd mask+0: 3(0.381,-5.969)
  Top Layer region: -5.568,1.016 6.432,1.016 6.432,9.65 -5.568,9.65
  silkscreen extent -5.57,-8.35 6.43,9.65, body extent -4.73,-6.84 5.43,7.8, height 4.57
"tro smd 0805" [mm]
  rect 1.2x1.4 smd: 1(-0.946,-0.061) 2(0.954,-0.061)
  silkscreen extent -1.75,-0.97 1.75,0.84, body extent -1.56,-0.76 1.44,0.64, height 0.53
"Tro SMD 0805" [mm]
  rect 1.2x1.4 smd: 1(-0.946,-0.061) 2(0.954,-0.061)
  silkscreen extent -1.75,-0.97 1.75,0.84, body extent -1.56,-0.76 1.44,0.64, height 0.53
"tro smd 1206" [mm]
  rect 1.5x1.6 smd: 1(-1.5,0) 2(1.5,0)
  silkscreen extent -2.44,-0.99 2.44,0.99, body extent -1.6,-0.8 1.6,0.8, height 0.6
TSSOP16-0.65-4.4MM [mm]
  oval 1.4x0.45 smd: 1(-2.95,2.275) 2(-2.95,1.625) 3(-2.95,0.975) 4(-2.95,0.325) 5(-2.95,-0.325) 6(-2.95,-0.975) 7(-2.95,-1.625) 8(-2.95,-2.275) 9(2.95,-2.275) 10(2.95,-1.625) 11(2.95,-0.975) 12(2.95,-0.325) 13(2.95,0.325) 14(2.95,0.975) 15(2.95,1.625) 16(2.95,2.275)
  silkscreen extent -3.07,-2.55 1.85,3.15, body extent -3.3,-2.55 3.3,2.55, height 1.2
"tu 0805" [mm] "Compoment SMD 80x50mil"
  rect 1.2x1.4 smd: 1(-0.946,-0.003) 2(0.954,-0.003)
  silkscreen extent -1.75,-0.89 1.75,0.89, body extent -1.01,-0.64 1.01,0.63, height 0.61
"tu 1206" [mm]
  rect 1.7x1.7 smd: 1(-1.65,0) 2(1.65,0)
  silkscreen extent -2.67,-1.02 2.67,1.02, body extent -1.57,-0.8 1.63,0.8, height 0.94
"tu nhom 6.3 (d)" [mm]
  rect 4x2 smd: 1(-2.9,0) 2(2.9,0)
  silkscreen extent -3.3,-3.3 3.3,3.3, body extent -3.8,-3.3 3.8,3.3, height 8
"tu nhom 8 (e)" [mm]
  rect 4x1.6 smd: 1(-3.1,0) 2(3.1,0)
  silkscreen extent -4.15,-4.15 4.15,4.15, body extent -4.88,-4.25 4.82,4.25, height 10.5
"tu nhom 8 (f)" [mm]
  rect 4x2 smd: 1(-3.55,0) 2(3.55,0)
  silkscreen extent -4.15,-4.15 4.15,4.15, body extent -4.85,-4.25 4.85,4.25, height 10.5
"tu nhom 10 (G)" [mm]
  rect 4.1x2 smd: 1(-4.35,0) 2(4.35,0)
  silkscreen extent -5.15,-5.15 5.15,5.15, body extent -5.9,-5.25 5.9,5.25, height 10.5
Type_C_16P [mm]
  rect 0.1x1.15 smd: A1(-3.302,0) A4(-2.54,0) A5(-1.27,0) A6(-0.25,0) A7(0.254,0) A8(1.274,0) A9(2.54,0) A12(3.302,0) B1(3.048,0) B4(2.286,0) B5(1.778,0) B6(0.762,0) B7(-0.762,0) B8(-1.774,0) B9(-2.286,0) B12(-3.048,0)
  oval 1x2 hole 1.6 slot 0.6 at 0 deg mask+0: ""(-4.318,-0.635) ""(-4.318,-4.699) ""(4.318,-0.635) ""(4.318,-4.699)
  body extent -4.79,-7.49 4.79,0.22, height 3.25
XH1X9M-P2.54-TH [mil]
  round 71 hole 40: 1(-400,0) 2(-300,0) 3(-200,0) 4(-100,0) 5(0,0) 6(100,0) 7(200,0) 8(300,0) 9(400,0)
  silkscreen extent -490,-100 490,130, body extent -492,-98 492,132, height 284

## Part data
BT1 BT2 BT3 BT4 BT5 BT6: library part "Nut Nhan 4 Chan Cam 6x6", "Nut Nhan 4 Chan 6x6mm", Ma_Hang=MH004584, Ten="Nút Nhấn 4 Chân 6x6x5MM DIP"
C1 C5 C15 C19: library part "Tu 0805 106 16V 10%", "Dán", Chung_Loai=Dán, Don_Vi=Con, Ma_Hang=MH004553, So_Chan=2, Ten_Linh_Kien="Tụ 0805 106-10uF 10% 16V"
C2 C3 C9 C10 C13 C14 C16 C21 C27 C33 C35 C36 C42 C48: library part "Tu 0805 104 50V 10%", "Dán", Chung_Loai=Dán, Don_Vi=Con, Ma_Hang=MH004551, So_Chan=2, Ten_Linh_Kien="Tụ 0805 104-100nF 10% 50V"
C4 C8: library part "Tu Nhom 220uF 10V", "Dán", Chung_Loai=Dán, Don_Vi=Con, Ma_Hang=MH004021, So_Chan=2, Ten_Linh_Kien="Tụ Nhôm 220uF 10V"
C6 C22 C23 C24 C28 C29 C30 C37: library part "Tu 0805 105 50V 10%", "Dán", Chung_Loai=Dán, Don_Vi=Con, Ma_Hang=MH004552, So_Chan=2, Ten_Linh_Kien="Tụ 0805 105-1uF 10% 50V"
C7: library part "Tu Nhom 100uF 50V", "Dán", Chung_Loai=Dán, Don_Vi=Con, Ma_Hang=MH002223, So_Chan=2, Ten_Linh_Kien="Tụ Nhôm 100uF 50V 8x10.2MM"
C11: library part "Tu 1206 22pF 50V 10%", "Dán", Chung_Loai=Dán, Don_Vi=Con, Ma_Hang=MH004547, So_Chan=2, Ten_Linh_Kien="Tụ 1206 22P 10% 50V"
C12 C18: library part "Tu 0805 680pF 50V 10%", "Dán", Chung_Loai=Dán, Don_Vi=Con, Ma_Hang=MH008098, So_Chan=2, Ten_Linh_Kien="Tụ 0805 680pF 50V 10%"
C17: library part "Tu 1206 104 50V 20%", "Dán", Chung_Loai=Dán, Don_Vi=Con, Ma_Hang=MH004544, So_Chan=2, Ten_Linh_Kien="Tụ 1206 104-0.1uF 20% 50V"
C20 C26: library part "Tu Nhom 470uF 35V", "Dán", Chung_Loai=Dán, Don_Vi=Con, Ma_Hang=MH004418, So_Chan=2, Ten_Linh_Kien="Tụ Nhôm 470uF 35V 10x10.5MM"
C25 C38 C41: library part "Tu 0805 33nF 50V 20%", "Dán", Chung_Loai=Dán, Don_Vi=Con, Ma_Hang=MH007854, So_Chan=2, Ten_Linh_Kien="Tụ 0805 33nF 50V 20%"
C31 C32 C45 C46 C47: library part "Tu 0805 22pF 50V 10%", "Dán", Chung_Loai=Dán, Don_Vi=Con, Ma_Hang=MH004560, So_Chan=2, Ten_Linh_Kien="Tụ 0805 22P 10% 50V"
C34: library part "Tu 0805 475 25V 20%", "Dán", Chung_Loai=Dán, Don_Vi=Con, Ma_Hang=MH004276, So_Chan=2, Ten_Linh_Kien="Tụ 0805 475-4.7uF 20% 25V"
C39: library part "Tu Nhom 100uF 25V", "Dán", Chung_Loai=Dán, Don_Vi=Con, Ma_Hang=MH002222, So_Chan=2, Ten_Linh_Kien="Tụ Nhôm 100uF 25V 6x7MM"
C40: library part "Tu 0805 10pF 50V 10%", "Dán", Chung_Loai=Dán, Don_Vi=Con, Ma_Hang=MH004554, So_Chan=2, Ten_Linh_Kien="Tụ 0805 10P 10% 50V"
C43 C50: library part "Tu 0805 102 50V 10%", "Dán", Chung_Loai=Dán, Don_Vi=Con, Ma_Hang=MH004549, So_Chan=2, Ten_Linh_Kien="Tụ 0805 102-1nF 10% 50V"
C44: library part "Tu 0805 471 50V 10%", "Dán", Chung_Loai=Dán, Don_Vi=Con, Ma_Hang=MH004564, So_Chan=2, Ten_Linh_Kien="Tụ 0805 471-470 10% 50V"
C49: library part "Tu 0805 33pF 50V 10%", "Dán", Chung_Loai=Dán, Don_Vi=Con, Ma_Hang=MH004563, So_Chan=2, Ten_Linh_Kien="Tụ 0805 33p 10% 50V"
CN1: library part RJ45-HR911105A-TH, "Single Port RJ45 Connector With Magnetics Module And LED - Through Hole"
CN2: "Connector XH2.54 9P - Through Hole"
D1: "1.0A Schottky Barrier Rectifiers - Surface Mount"
D5: "3.0A Schottky Barrier Rectifiers - Surface Mount"
D6: "5.0A Schottky Barrier Rectifiers - Surface Mount"
F1: "Chip Fuses - Surface Mount"
HB1: library part HB9500
JP1 JP2 JP6 JP7 JP8: library part "JP 1x5 2.54 Duc Thang", "Cắm", Chung_Loai=Cắm, Don_Vi=Con, Ma_Hang=MH000903, Ten_Linh_Kien="Jump Đơn Đực 2.54MM 1x40P Thẳng 11MM"
JP3 JP4: library part "JP 1x9 2.54 Duc Thang", "Cắm", Chung_Loai=Cắm, Don_Vi=Con, Ma_Hang=MH000903, Ten_Linh_Kien="Jump Đơn Đực 2.54MM 1x40P Thẳng 11MM"
JP5: library part "JP 1x4 2.54 Duc Thang", "Cắm", Chung_Loai=Cắm, Don_Vi=Con, Ma_Hang=MH000903, Ten_Linh_Kien="Jump Đơn Đực 2.54MM 1x40P Thẳng 11MM"
JP9: library part "JP 2x5 2.54 Duc Thang", "Cắm", Chung_Loai=Cắm, Don_Vi=Con, Ma_Hang=MH002686, Ten_Linh_Kien="Jump Đôi Đực 2.54MM 2x40P Thẳng 11MM"
L1: library part L-FILTER-TH, "EMI Filter Inductor - Through Hole"
L2 L12: library part "CUON CAM 100uH SMD", "Dán", Chung_Loai=Dán, Don_Vi=Con, Ten_Linh_Kien="Cuộn Cảm 100uH 7x7x4MM CD74"
L3: library part L-CHIP-SM, "Chip Inductor - Surface Mount"
MOV1: library part MOV-TH, "Metal Oxide Varistor - Through Hole"
P1: "15EDG - 4P - 3.81 mm - đực thẳng"
Q1 Q2: "0.5A 25V NPN General Purpose Transistors - Surface Mount"
Q3 Q4: library part "C1815 HF SMD", "NPN transistor"
Q5 Q6: library part 2N3904(1AM)-SM, "NPN General Purpose Transistors 0.2A 40V - Surface Mount"
R1 R14 R21 R27 R28 R29 R30 R31 R32 R33 R34 R35 R36 R37 R38 R39 R40 R41 R43 R44 R45 R46 R47 R49 R50 R52 R53: library part "Tro 0805 5% 10k", "Dán", Chung_Loai=Dán, Don_Vi=Con, Ma_Hang=MH005239, So_Chan=2, Ten_Linh_Kien="Trở 0805 5% 10k"
R2 R3: library part "Tro 0805 1% 5.1k", "Dán", Chung_Loai=Dán, Don_Vi=Con, Ma_Hang=MH008812, So_Chan=2, Ten_Linh_Kien="Trở 0805 1% 5.1k"
R4 R5 R55 R56: library part "Tro 0805 5% 1k", "Dán", Chung_Loai=Dán, Don_Vi=Con, Ma_Hang=MH005234, So_Chan=2, Ten_Linh_Kien="Trở 0805 5% 1k"
R6: library part "Tro 1206 5% 1k", "Dán", Chung_Loai=Dán, Don_Vi=Con, Ma_Hang=MH005904, So_Chan=2, Ten_Linh_Kien="Trở 1206 5% 1k"
R7 R8 R42 R57 R58 R61 R62 R66 R67: library part "Tro 0805 5% 4.7k", "Dán", Chung_Loai=Dán, Don_Vi=Con, Ma_Hang=MH005307, So_Chan=2, Ten_Linh_Kien="Trở 0805 5% 4.7k"
R9 R11: library part "Tro 0805 5% 30R", "Dán", Chung_Loai=Dán, Don_Vi=Con, Ma_Hang=MH005315, So_Chan=2, Ten_Linh_Kien="Trở 0805 5% 30R"
R10 R12 R13 R16 R17 R18 R20 R22: library part "Tro 0805 5% 330R", "Dán", Chung_Loai=Dán, Don_Vi=Con, Ma_Hang=MH005337, So_Chan=2, Ten_Linh_Kien="Trở 0805 5% 330R"
R15: library part "Tro 0805 5% 10R", "Dán", Chung_Loai=Dán, Don_Vi=Con, Ma_Hang=MH005240, So_Chan=2, Ten_Linh_Kien="Trở 0805 5% 10R"
R19 R23: library part "Tro 0805 5% 62R", "Dán", Chung_Loai=Dán, Don_Vi=Con, Ma_Hang=MH005324, So_Chan=2, Ten_Linh_Kien="Trở 0805 5% 62R"
R24 R26: library part "Tro 0805 5% 22k", "Dán", Chung_Loai=Dán, Don_Vi=Con, Ma_Hang=MH005248, So_Chan=2, Ten_Linh_Kien="Trở 0805 5% 22k"
R25: library part "Tro 0805 1% 1k", "Dán", Chung_Loai=Dán, Don_Vi=Con, Ma_Hang=MH005468, So_Chan=2, Ten_Linh_Kien="Trở 0805 1% 1k"
R48: library part "Tro 0805 5% 12k", "Dán", Chung_Loai=Dán, Don_Vi=Con, Ma_Hang=MH005241, So_Chan=2, Ten_Linh_Kien="Trở 0805 5% 12k"
R51: library part "Tro 0805 1% 1M", "Dán", Chung_Loai=Dán, Don_Vi=Con, Ma_Hang=MH005469, So_Chan=2, Ten_Linh_Kien="Trở 0805 1% 1M"
R54: library part "Tro 0805 5% 390R", "Dán", Chung_Loai=Dán, Don_Vi=Con, Ma_Hang=MH005339, So_Chan=2, Ten_Linh_Kien="Trở 0805 5% 390R"
R59 R60: library part "Tro 0805 5% 47k", "Dán", Chung_Loai=Dán, Don_Vi=Con, Ma_Hang=MH005320, So_Chan=2, Ten_Linh_Kien="Trở 0805 5% 47k"
R63 R64 R65: library part "Tro 0805 5% 22R", "Dán", Chung_Loai=Dán, Don_Vi=Con, Ma_Hang=MH005249, So_Chan=2, Ten_Linh_Kien="Trở 0805 5% 22R"
R68: library part "Tro 0805 1% 2k", "Dán", Chung_Loai=Dán, Don_Vi=Con, Ma_Hang=MH005471, So_Chan=2, Ten_Linh_Kien="Trở 0805 1% 2k"
T1: library part "Bien Tro Tinh Chinh 10K Dung", "Cắm", Chung_Loai=Cắm, Don_Vi=Con, Ma_Hang=MH003232, Ten_Linh_Kien="Biến Trở VR 103-10K 3296W"
U1: library part LM2596, Max Input Voltage="12 V", Max Output Current="3 (6.0 peak) A", Max Output Voltage=mV, Temperature Range="-40 to +125 degC", Category=IC-Power, Min Input Voltage=mV, Min Output Voltage=mV, Mounting Technology="Surface Mount", Status=Unreleased, Supply Voltage=mV
U3: "8-Bit Shift Registers With 3-State Output Registers - Surface Mount"
U4: library part XL4015-SM, "5A 180KHz 36V Buck DC to DC Converter - Surface Mount"
U5: "Ethernet ICs 3in1 Enet Controller TCP/IP +MAC+PHY - Surface Mount"
U6: "LTE CAT 1 module, 4G + (GNSS)"
Y1: library part "Thach Anh 2 chan Cam", "Crystal For all Crystal 2pin."

## Via types
v1: diameter 0.8, hole 0.5, Top Layer to Bottom Layer, tented both sides, 68 vias
v2: diameter 0.5, hole 0.3, Top Layer to Bottom Layer, tented both sides, 9 vias
v3: diameter 3, hole 2, Top Layer to Bottom Layer, tented both sides, 4 vias

## Nets (pads, with @x,y where several pads share a name; then routed paths per layer and width w, separated by ;. In a path a pad name is that pad's centre, name@x,y a point inside that pad or via, vN(x,y) a via of type N, cw(c..) or ccw(c..) an arc to the next point about the centre after c; other vN are vias at no path point)
1.2V: C35.1 U5.22 | length 8.4
  Top Layer w0.254: C35.1@3.846,75.903 3.846,76.003 4.319,76.476 4.976,76.476 6.5,78 6.5,79.4 7.9,80.8 U5.22@9.3,80.8
3V3: R39.2 R40.2 R41.2 R45.2 R46.2 R47.2 | length 153.4
  Top Layer w1.5: R45.2@18.668,11.023 14.723,11.023 12.9,9.2 12.9,3.2 15.123,0.977 24.677,0.977 27,3.3 ; R46.2@32.763,10.823 28.423,10.823 27,9.4 27,3.3 ; R41.2@46.859,10.823 43.223,10.823 40.7,8.3 40.7,3.5 ; R47.2@60.954,10.823 57.323,10.823 54.9,8.4 54.9,3 ; R40.2@75.05,10.623 70.723,10.623 68.7,8.6 68.7,4.144 ; R39.2@89.146,10.561 85.561,10.561 82.4,7.4 82.4,2.9 80.477,0.977 71.867,0.977 68.7,4.144 ; 27,3.3 29.323,0.977 38.177,0.977 40.7,3.5 ; 40.7,3.5 43.223,0.977 52.877,0.977 54.9,3 ; 54.9,3 56.923,0.977 65.9,0.977 68.7,3.777 68.7,4.144
3V3_A: C9.1 C27.2 C33.1 L3.2 R9.1 R11.1 R15.1 U5.4 U5.8 U5.11 U5.15 U5.17 U5.21 | length 107.6
  Top Layer w0.254: C33.1@3.846,78.903 C33.1@3.846,79.003 ; U5.21@9.3,81.3 6.142,81.3 C33.1@3.846,79.003 ; U5.17@9.3,83.3 9.291,83.309 8.491,83.309 7.5,84.3 ; 10.112,84.309 9.309,84.309 U5.15@9.3,84.3 7.5,84.3 ; U5.8@12.8,86.8 12.8,85.879 12.521,85.6 ; U5.4@14.809,86.196 14.677,86.065 14.677,86.044 14.456,85.823 14.435,85.823 14.212,85.6 12.521,85.6 ; U5.4@14.809,86.199 14.809,85.646 15.155,85.3 16.613,85.3 16.99,85.677 18.639,85.677 18.822,85.86 v1(18.97,85.86) ; C33.1@3.846,79.003 2.549,80.3 1.4,80.3 0.9,80.8 0.9,82.6 1.4,83.1 2.56,83.1 3.76,84.3 5.92,84.3 ; 5.92,84.3 7.5,84.3 ; 5.92,84.3 9.86,88.24 11.024,88.24 11.3,87.964 U5.11@11.3,86.8 11.3,85.6 12.521,85.6
  Top Layer w1.5: v1(35,94) 35,105.4 36.5,106.9 46.6,106.9 48.2,105.3 L3.2@48.7,105.3
  Bottom Layer w0.254: v1(18.97,85.86) v1@19.005,85.86
  Bottom Layer w1.5: v1@19.005,85.86 19.005,84.661 18.349,84.004 17.899,83.554 C9.1@17.297,83.554 17.297,81.603 18.3,80.6 24.3,80.6 26.039,82.339 26.039,83.654 R15.1@26.139,83.754 26.184,83.71 30.895,83.71 R9.1@30.939,83.754 30.985,83.709 32.679,83.709 34.939,85.969 R11.1@34.939,89.154 36.121,89.154 37,90.033 37,93 36,94 v1(35,94)
3V3_D: C1.1 C2.1 C8.2 C13.1 C14.1 C44.1 ESP1.2 JP2.2 JP7.1 JP7.2 JP7.3 JP7.4 JP7.5 JP9.6 L2.2 L3.1 pp1.4 R1.2 R4.1 R5.1 R25.2 R28.2 R36.2 R38.2 R43.2 R44.2 R49.2 R50.2 R53.2 R62.2 T1.1 U2.6 U5.28 | length 422.6
  Top Layer w0.254: pp1.4@7.2,58.8 pp1.4@8.2,58.8 ; U5.28@12.3,78.3 12.3,77.091 12.318,77.073
  Top Layer w0.6: v1(6.7,87.3) 5.2,88.8 1.6,88.8 1.1,89.3 1.1,91.37 1.584,91.854 2.261,91.854 R28.2@2.561,92.154 2.661,92.154 3.2,92.694 3.794,92.694 4.6,93.5 6.947,93.5 7.747,92.7 7.747,93.847 10.6,96.7 10.6,100.709 11.646,101.754 ; v2@6.71,74.56 7.77,75.62 10.865,75.62 12.318,77.073 ; pp1.4@8.2,58.8 18.9,58.8 21.2,61.1 22.9,62.8 R53.2@22.9,62.9 22.9,64.9 21.5,66.3 19.343,66.3 17.8,67.843 R43.2@17.7,67.843 ; v1(11.1,105.4) 11.1,102.3 11.646,101.754 ; JP9.6@12.24,46.54 12.24,46.269 10.981,45.01 10.981,43.459 11.09,43.35 11.09,30.104 14.94,26.254 14.94,20.31 14.33,19.7 JP7.1@12.98,19.7 ; v2(13.03,66.729) 13.127,66.729 13.479,67.08 13.479,67.543 13.779,67.843 R44.2@13.879,67.843 ; R38.2@13.061,101.454 12.761,101.754 11.646,101.754 ; JP2.2@41.2,63.38 43.8,60.78 43.8,58.5 47.613,54.687 49.375,54.687 49.432,54.63 50.703,55.901 50.703,58.497 C1.1@47.9,61.3 ; R1.2@65.6,63.257 65.778,63.435 67.775,63.435 72.36,68.02 75.54,68.02 76.46,67.1 76.46,59.585 79.727,56.318 79.727,48.469 79.1,47.842 v1(79.1,46.5) ; v1(83.4,22) 83.454,22 83.554,21.9 85.351,21.9 C44.1@85.397,21.946 85.497,21.946 85.797,22.246 85.797,22.346 86.054,22.603 R62.2@86.054,26.056 89.1,29.102 v1(89.1,29.5)
  Top Layer w1.5: JP7.5@2.82,19.7 JP7.4@5.36,19.7 5.379,19.681 7.881,19.681 JP7.3@7.9,19.7 JP7.2@10.44,19.7 10.459,19.681 12.889,19.681 12.98,19.59 JP7.1@12.98,19.7 ; JP9.6@12.24,46.54 12.259,46.559 12.259,49.559 14.8,52.1 18.918,52.1 19.618,51.4 27.284,51.4 28.721,49.963 29.963,49.963 31.5,51.5 31.5,54.818 v2(28.318,58) R50.2@22.957,58 ; R49.2@22.854,53.939 22.9,53.985 22.9,57.994 R50.2@22.854,58.039 22.9,58.085 R53.2@22.9,62.8 ; C1.1@48.403,61.354 C2.1@54.133,61.354 54.954,61.354 58.9,65.3 63.557,65.3 ; C8.2@55.716,85.95 55.716,88.071 50.679,93.108 50.679,93.508 48.8,95.387 48.8,102.5 50.5,104.2 L3.1@50.5,105.3 63.9,105.3 L2.2@65.6,103.6 ; C8.2@56.1,85.9 56.15,85.85 57.35,85.85 59.6,83.6 59.6,69.257 63.557,65.3 ; R1.2@65.6,63.257 63.557,65.3
  Bottom Layer w0.254: R5.1@25.481,106.4 25.954,105.927 R5.1@25.954,105.861 R5.1@25.961,105.861 ; v1(83.4,22) 82.7,22.7 82.7,23.851 82.974,24.125 84.276,24.125 84.549,23.851 U2.6@84.549,23.448
  Bottom Layer w0.6: v1(6.7,87.3) 6.7,85.945 5.97,85.215 5.97,75.26 5.977,75.26 v2(6.714,74.523) 6.714,72.796 12.781,66.729 v2(13.03,66.729) 13.279,66.729 14.219,67.669 14.219,68.599 14.8,69.18 16.443,69.18 v2(18.973,66.65) ; v1(11.1,105.4) 12.67,106.97 23.257,106.97 24.427,105.8 25.654,105.8 25.715,105.861 R5.1@25.954,105.861 ; R5.1@25.961,105.861 25.961,105.967 26.974,106.98 33.32,106.98 34.932,105.368 R4.1@34.932,102.624 ; R25.2@77.392,31.804 77.392,40.719 76.762,41.349 76.762,44.079 77.392,44.709 77.392,44.792 v1(79.1,46.5) ; C13.1@86.749,31.864 86.749,31.764 88.976,29.538 89.062,29.538 v1(89.1,29.5)
  Bottom Layer w1.5: JP7.1@12.97,19.71 JP7.1@12.98,19.7 ; v2(28.318,58) 35.82,58 JP2.2@41.2,63.38 ; R25.2@77.404,31.804 77.404,33.096 78.507,34.2 81,34.2 82.104,33.096 C14.1@82.104,31.868 ; 82.104,33.204 83,34.1 85.7,34.1 86.749,33.051 C13.1@86.749,31.864
3V8: C25.1 C26.1 L12.2 R42.2 R54.2 | length 83.2
  Top Layer w0.6: L12.2@69.7,26.4 69.7,26.849 72.3,29.449 73.996,29.449 76.4,31.853 76.4,36.5 78,38.1 80.7,38.1 84.761,34.039 84.761,33.554 85.061,33.254 R54.2@85.161,33.254
  Top Layer w1.5: C26.1@27.65,33.4 30.9,33.4 33.384,30.916 37.674,30.916 37.69,30.9 v1(49.6,30.9) ; v1(54.9,19.9) 56.3,18.5 67.806,18.5 68.685,19.379 68.685,24.785 L12.2@69.6,25.7
  Bottom Layer w1.5: v1(49.6,30.9) 54.9,25.6 v1(54.9,19.9)
5V: C4.1 C5.1 C7.1 C20.1 C21.1 D1.2 JP5.2 JP6.1 JP6.2 JP6.3 JP6.4 JP6.5 JP9.5 P1.1 U1.1 U3.10 U3.16 U4.4 U4.5 | length 282.5
  Top Layer w0.6: 38.828,65.122 38.759,65.192 38.759,65.689 38.835,65.766 38.835,67.569 39.186,67.92 42.786,67.92 45.216,70.35 45.925,70.35 U3.10@45.95,70.375 48.045,70.375 JP5.2@52.02,66.4 52.201,66.581 53.044,66.581 54.063,67.6 55.2,67.6 57.1,69.5 57.1,72.2 52.749,76.551 49.449,76.551 C7.1@49.4,76.6 ; C5.1@41.254,85.997 41.254,85.897 40.3,84.942 D1.2@40.3,80.5 40.774,80.026 40.774,79.126 U3.16@45.55,74.35 ; U3.16@45.95,74.275 48.275,74.275 48.951,74.951 48.951,75.8 49.12,75.968 C7.1@49.968,75.968 ; C7.1@50.175,76.175 C7.1@50.825,76.175 ; C4.1@78.55,73.25 C4.1@78.6,73.3 ; C4.1@79.8,73.3 81,73.3 83.49,70.81 101.87,70.81 P1.1@104.912,73.852
  Top Layer w1.5: JP6.5@2.82,17 JP6.4@5.36,17 JP6.3@7.9,17 JP6.2@10.44,17 14.94,17 ; 38.828,65.122 38.41,64.704 38.41,56.852 38.5,56.762 38.5,52.15 34.85,48.5 31.5,48.5 28.7,45.7 C20.1@27.65,45.7 27.65,45.8 27.5,45.95 27.5,48.921 26.621,49.8 15.7,49.8 14.2,48.3 14.2,45.9 12.3,44 JP9.5@12.24,44 12.24,30.58 16.09,26.73 16.09,18.15 14.94,17 ; C21.1@52.697,24.946 51.379,24.946 50.5,24.067 50.5,21.456 49.621,20.577 46.016,20.577 43.893,22.7 41,22.7 U4.4@40.9,22.8 U4.5@40.9,24.5 39.825,24.5 36.425,27.9 25.682,27.9 24.7,26.918 24.7,16.679 23.821,15.8 19.9,15.8 18.7,17 14.94,17 ; v1(63.7,69.5) 74.8,69.5 78.55,73.25 79.75,73.25 C4.1@79.8,73.3 ; U1.1@70.119,85.319 70.119,84.269 74.9,79.488 74.9,78.2 78.55,74.55 78.55,73.35 C4.1@78.6,73.3
  Bottom Layer w1.5: JP5.2@52.02,66.4 52.02,68.48 51.821,68.679 51.821,70.021 53.8,72 61.2,72 v1(63.7,69.5)
/INT: ESP1.6 JP4.1 JP9.2 R43.1 U5.36 | length 94.3
  Top Layer w0.254: U5.36@16.3,78.3 16.309,78.291 16.309,77.591 18.7,75.2 18.7,71.8 17.9,71 17.9,69.943 R43.1@17.7,69.743 ; R43.1@17.8,69.743 19,68.543 19,67.9 19.9,67 21.7,67 24.453,64.247 24.453,63.247 v2(35.06,52.64) ; JP4.1@40.7,52.64 JP4.1@41.2,53.14
  Top Layer w0.6: JP4.1@41.2,53.14 44.74,49.6 48.65,49.6 ESP1.6@48.7,49.55
  Bottom Layer w0.254: JP9.2@4.62,43.98 4.82,43.98 4.82,43.8 6.474,42.146 15.525,42.146 20.28,46.901 20.441,46.901 27.79,54.25 40.09,54.25 JP4.1@41.2,53.14 38.06,53.14 37.56,52.64 v2(35.06,52.64)
  Bottom Layer w0.6: JP9.2@4.62,43.98 JP9.2@4.62,44
/RESET: ESP1.7 JP4.2 JP9.3 R34.1 U5.37 | length 94.8
  Top Layer w0.254: U5.37@17.8,79.8 17.8,78.801 19.646,76.955 19.646,72.753 20.2,72.199 20.2,69.6 21.5,68.3 R34.1@21.5,68.2 21.4,68.1 v1(20,68.1)
  Top Layer w0.6: JP4.2@41.2,50.6 43.52,48.28 ESP1.7@48.7,48.28
  Bottom Layer w0.254: JP9.3@7.16,44 7.3,44 7.3,43.86 8.66,42.5 15.34,42.5 19.5,46.66 19.5,67.6 v1(20,68.1) 20,63.6 27.15,56.45 39.05,56.45 40.767,54.733 41.567,54.733 42.8,53.5 42.8,51.9 41.5,50.6 JP4.2@41.2,50.6
ACTLED: CN1.10 U5.27 | length 49.9
  Top Layer w0.254: v1(9.2,76.9) 11.4,76.9 11.791,77.291 11.791,78.291 U5.27@11.8,78.3 ; v1(15,105.6) 25.86,105.6 CN1.10@28.06,103.4
  Bottom Layer w0.254: v1(9.2,76.9) 9.096,77.004 9.096,77.304 8.2,78.2 8.2,86.1 10.627,88.527 10.627,100.427 12.825,102.625 14.3,104.1 14.3,105.016 14.884,105.6 v1(15,105.6) ; CN1.10@28.06,103.4 CN1.10@28.06,103.54
BOOT: BT1.2 C22.2 ESP1.15 JP3.9 Q2.3 R39.1 | length 98.7
  Top Layer w0.254: C22.2@90.954,13.297 91.046,13.205 R39.1@91.046,10.561 91.046,5.191 BT1.2@93.083,3.153 BT1.2@93.153,3.153
  Top Layer w0.6: ESP1.15@67.75,39.39 68.469,39.39 68.607,39.251 68.607,38.893 73.509,33.991 73.509,33.611 JP3.9@73.809,33.311
  Bottom Layer w0.254: JP3.9@74,33.12 74,33.04 74.784,32.256 74.784,17.716 77.408,15.092 83.8,8.7 83.8,3.1 85.8,1.1 91.031,1.1 BT1.2@93.083,3.153 ; BT1.2@86.2,3.153 BT1.2@93.083,3.153 ; Q2.3@103.849,25.364 103.8,25.315 103.8,16.2 93.083,5.483 BT1.2@93.083,3.153
BUT1: BT4.2 C28.2 ESP1.10 JP4.5 R45.1 | length 74
  Top Layer w0.254: C28.2@20.576,13.746 20.568,13.738 R45.1@20.568,11.023 20.568,5.869 BT4.2@23.283,3.153
  Top Layer w0.6: JP4.5@41.2,42.98 42.72,44.5 48.67,44.5 ESP1.10@48.7,44.47
  Bottom Layer w0.254: BT4.2@16.4,3.153 BT4.2@23.283,3.153 24.9,4.769 24.9,26.68 JP4.5@41.2,42.98
BUT2: BT5.2 C29.2 ESP1.11 JP4.6 R46.1 | length 68.4
  Top Layer w0.254: C29.2@34.652,13.546 34.663,13.535 R46.1@34.663,10.823 35.1,10.386 34.836,10.386 34.7,10.25 34.7,5.696 BT5.2@37.243,3.153
  Top Layer w0.6: JP4.6@41.2,40.44 43.96,43.2 ESP1.11@48.7,43.2
  Bottom Layer w0.254: BT5.2@30.36,3.153 BT5.2@37.243,3.153 39,4.909 39,10.9 36.6,13.3 36.6,35.84 JP4.6@41.2,40.44
BUT3: BT3.2 C24.2 ESP1.12 JP4.7 R41.1 | length 71.1
  Top Layer w0.254: C24.2@48.728,13.546 48.7,13.519 48.7,10.881 R41.1@48.759,10.823 48.759,5.597 BT3.2@51.203,3.153
  Top Layer w0.6: JP4.7@41.2,37.9 41.2,38.1 41.4,38.1 45.23,41.93 ESP1.12@48.7,41.93
  Bottom Layer w0.254: JP4.7@41.2,37.9 37.9,34.6 37.9,26.7 53.4,11.2 53.4,5.349 BT3.2@51.203,3.153 BT3.2@44.32,3.153
BUT4: BT6.2 C30.2 ESP1.13 JP4.8 R47.1 | length 76
  Top Layer w0.254: C30.2@62.803,13.546 62.854,13.495 R47.1@62.854,10.823 62.854,5.462 BT6.2@65.163,3.153
  Top Layer w0.6: JP4.8@41.2,35.36 46.5,40.66 ESP1.13@48.7,40.66
  Bottom Layer w0.254: JP4.8@41.2,35.36 39.125,33.285 39.125,33.075 60.9,11.3 65.3,11.3 67.1,9.5 67.1,5.089 BT6.2@65.163,3.153 BT6.2@58.28,3.153